# Altium PCB InterfaceBoard_PCB.PcbDoc (part 1 of 2)
Units mil, origin at the board's own origin, x right, y up, seen from the top; angles counter-clockwise.
Board outline 1629.92 x 1653.54 mil, 2 copper layers (Top Layer, Bottom Layer), stack 57 mil thick; 66 components, 48 nets, 226 pads, 80 vias.
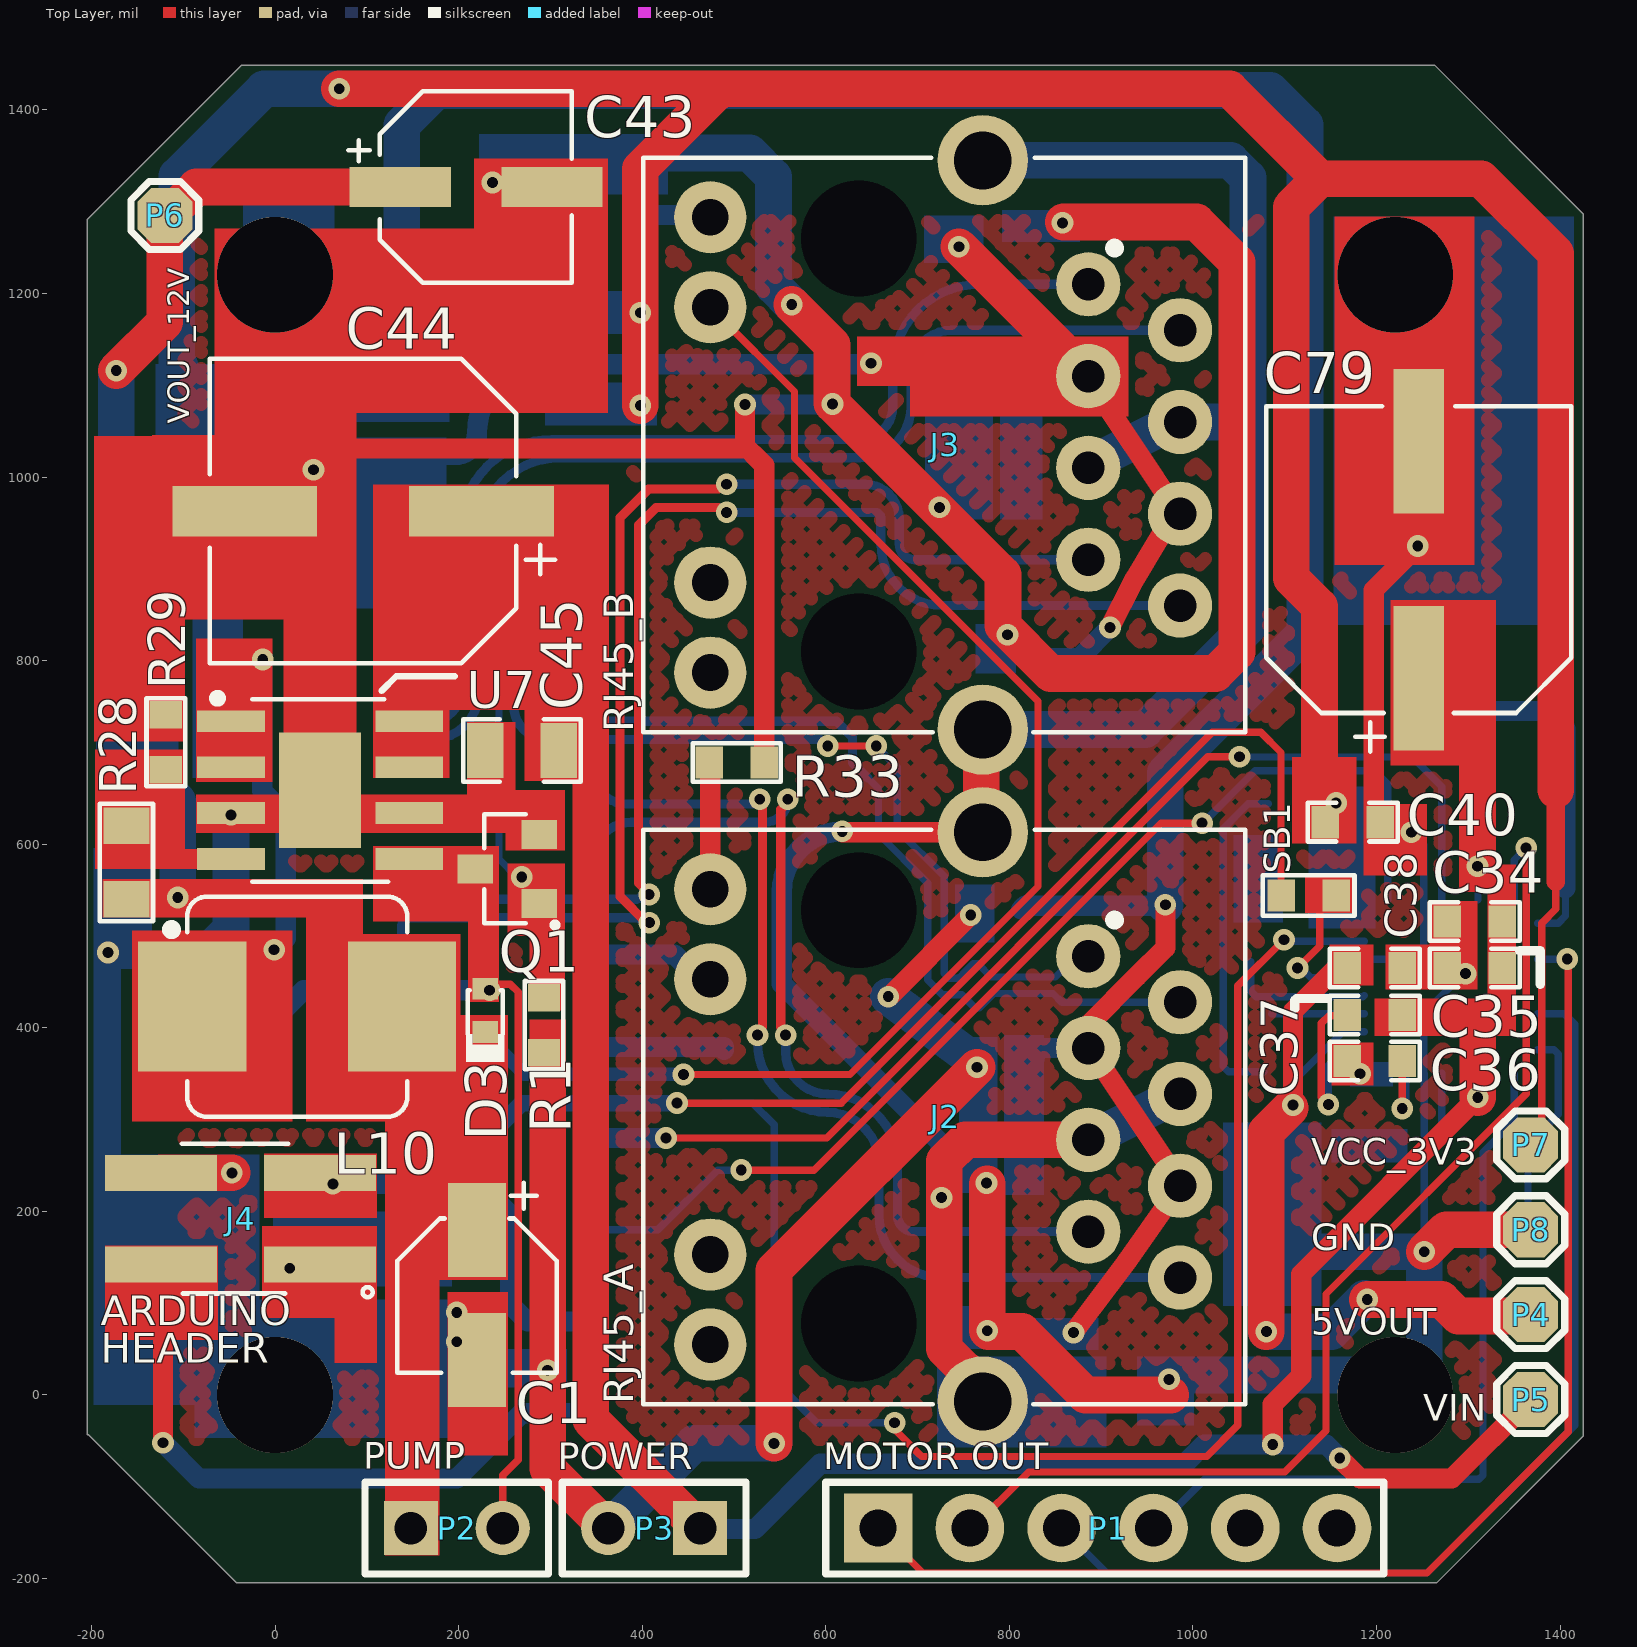
[diagram p0: Top Layer view]
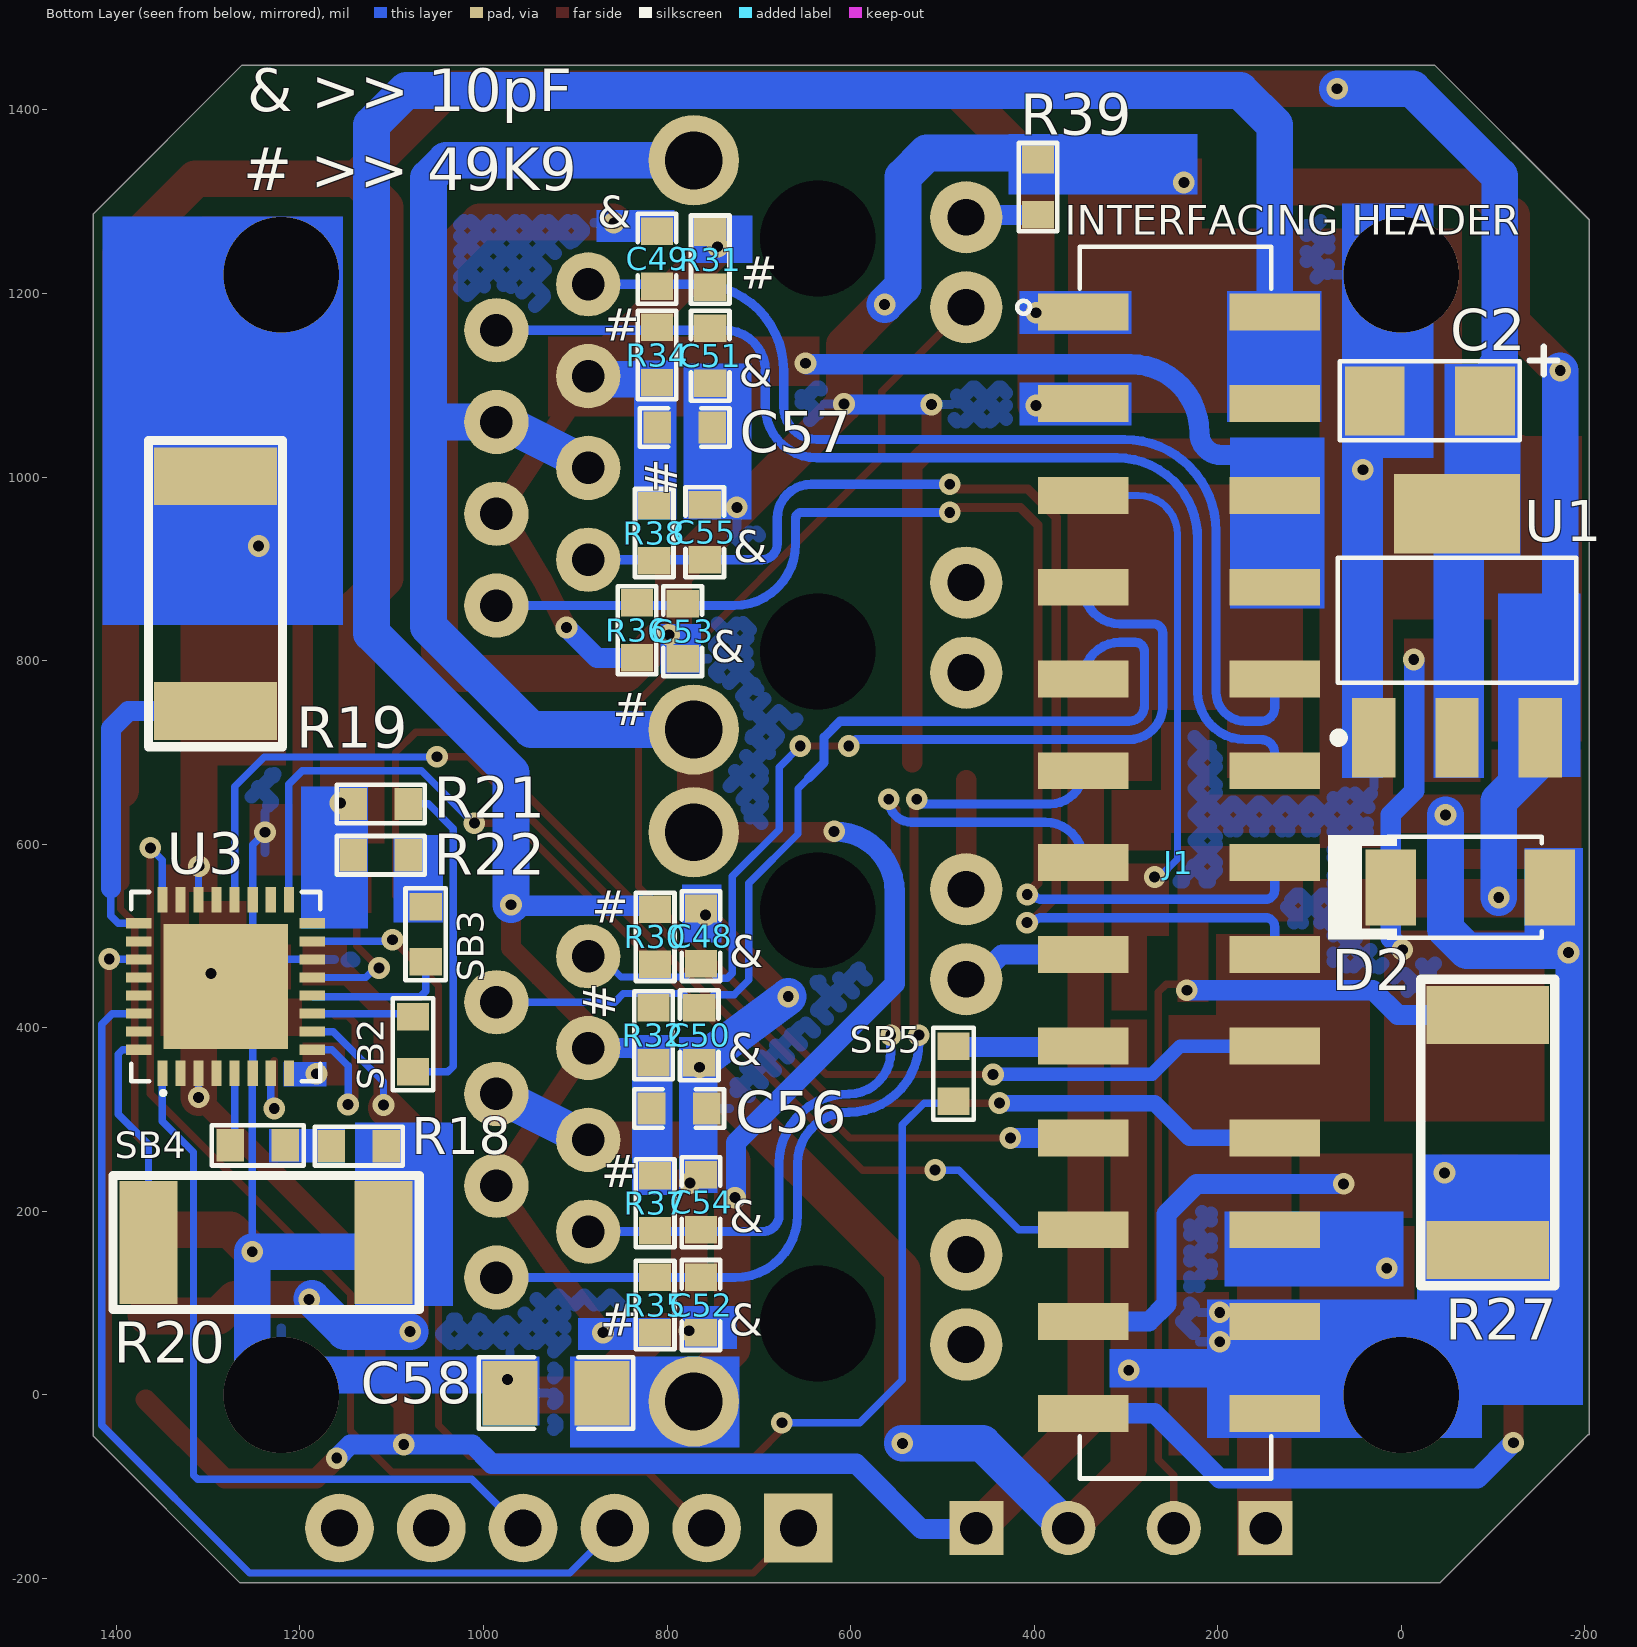
[diagram p1: Bottom Layer view, seen from below]
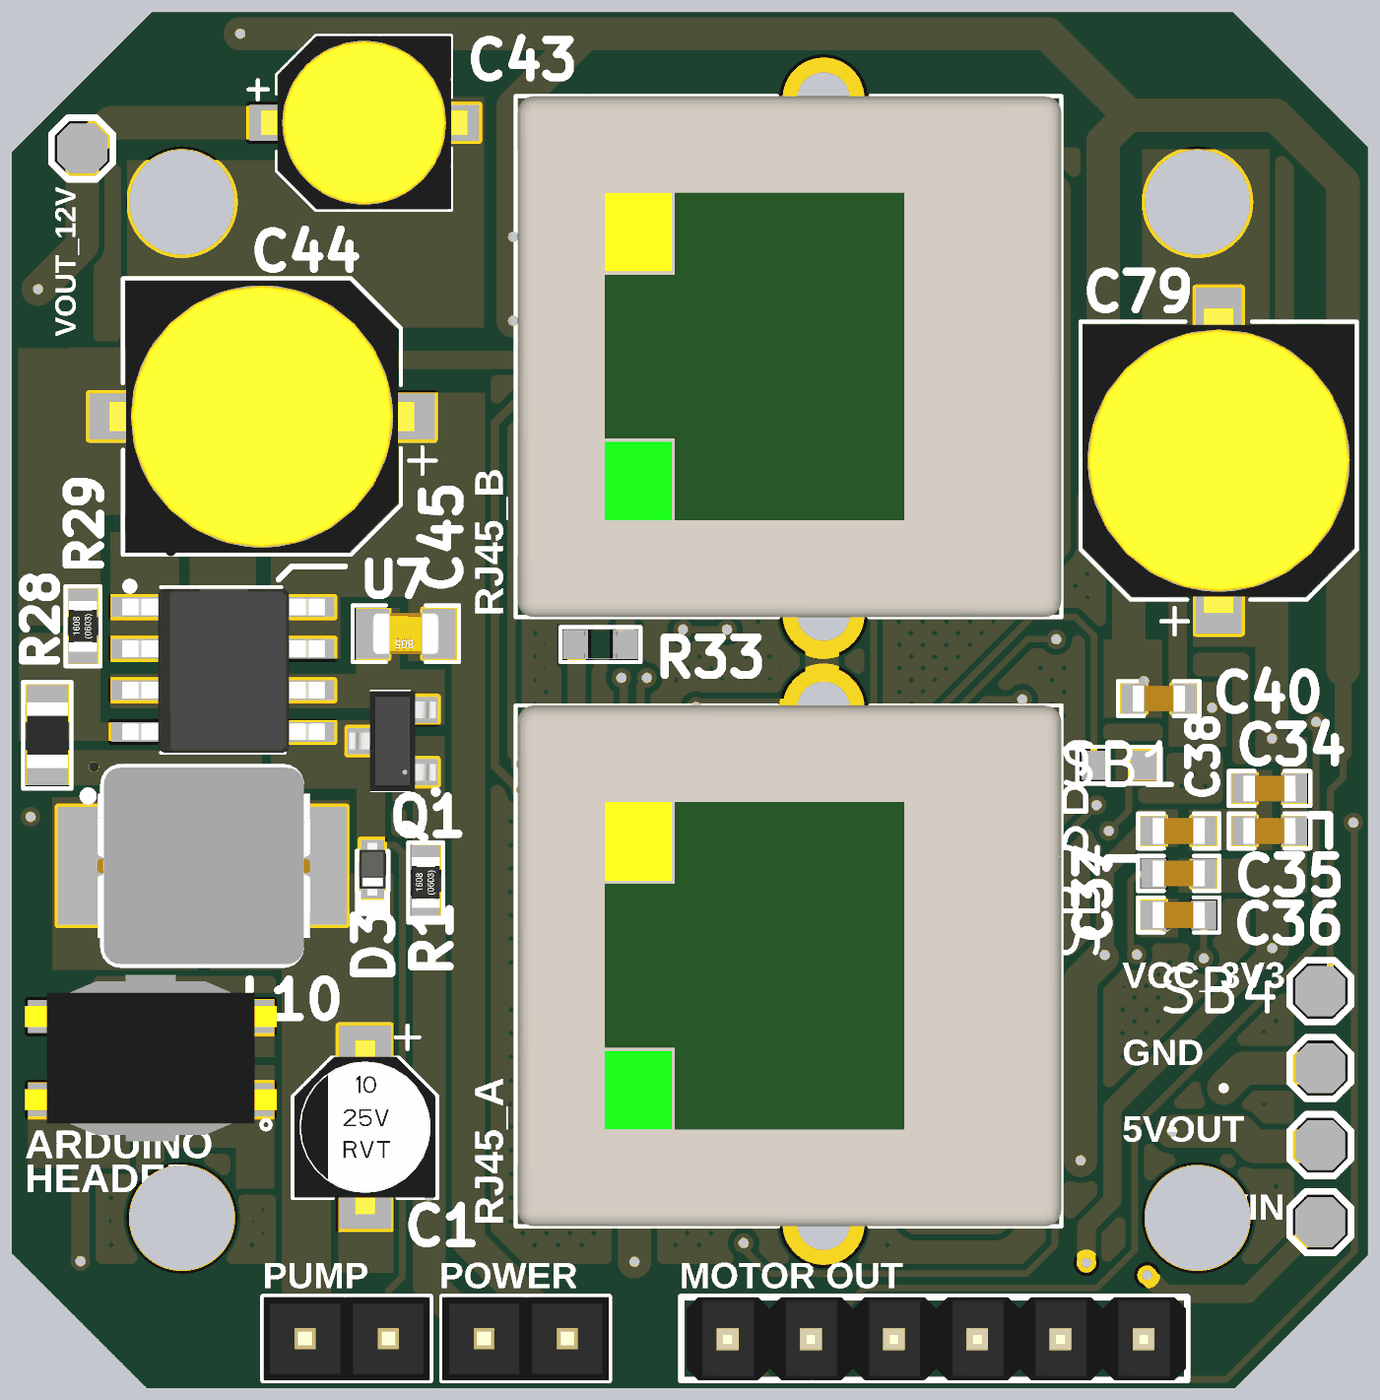
[diagram p2: 3D render of the assembled board from above, using the file's embedded part models]
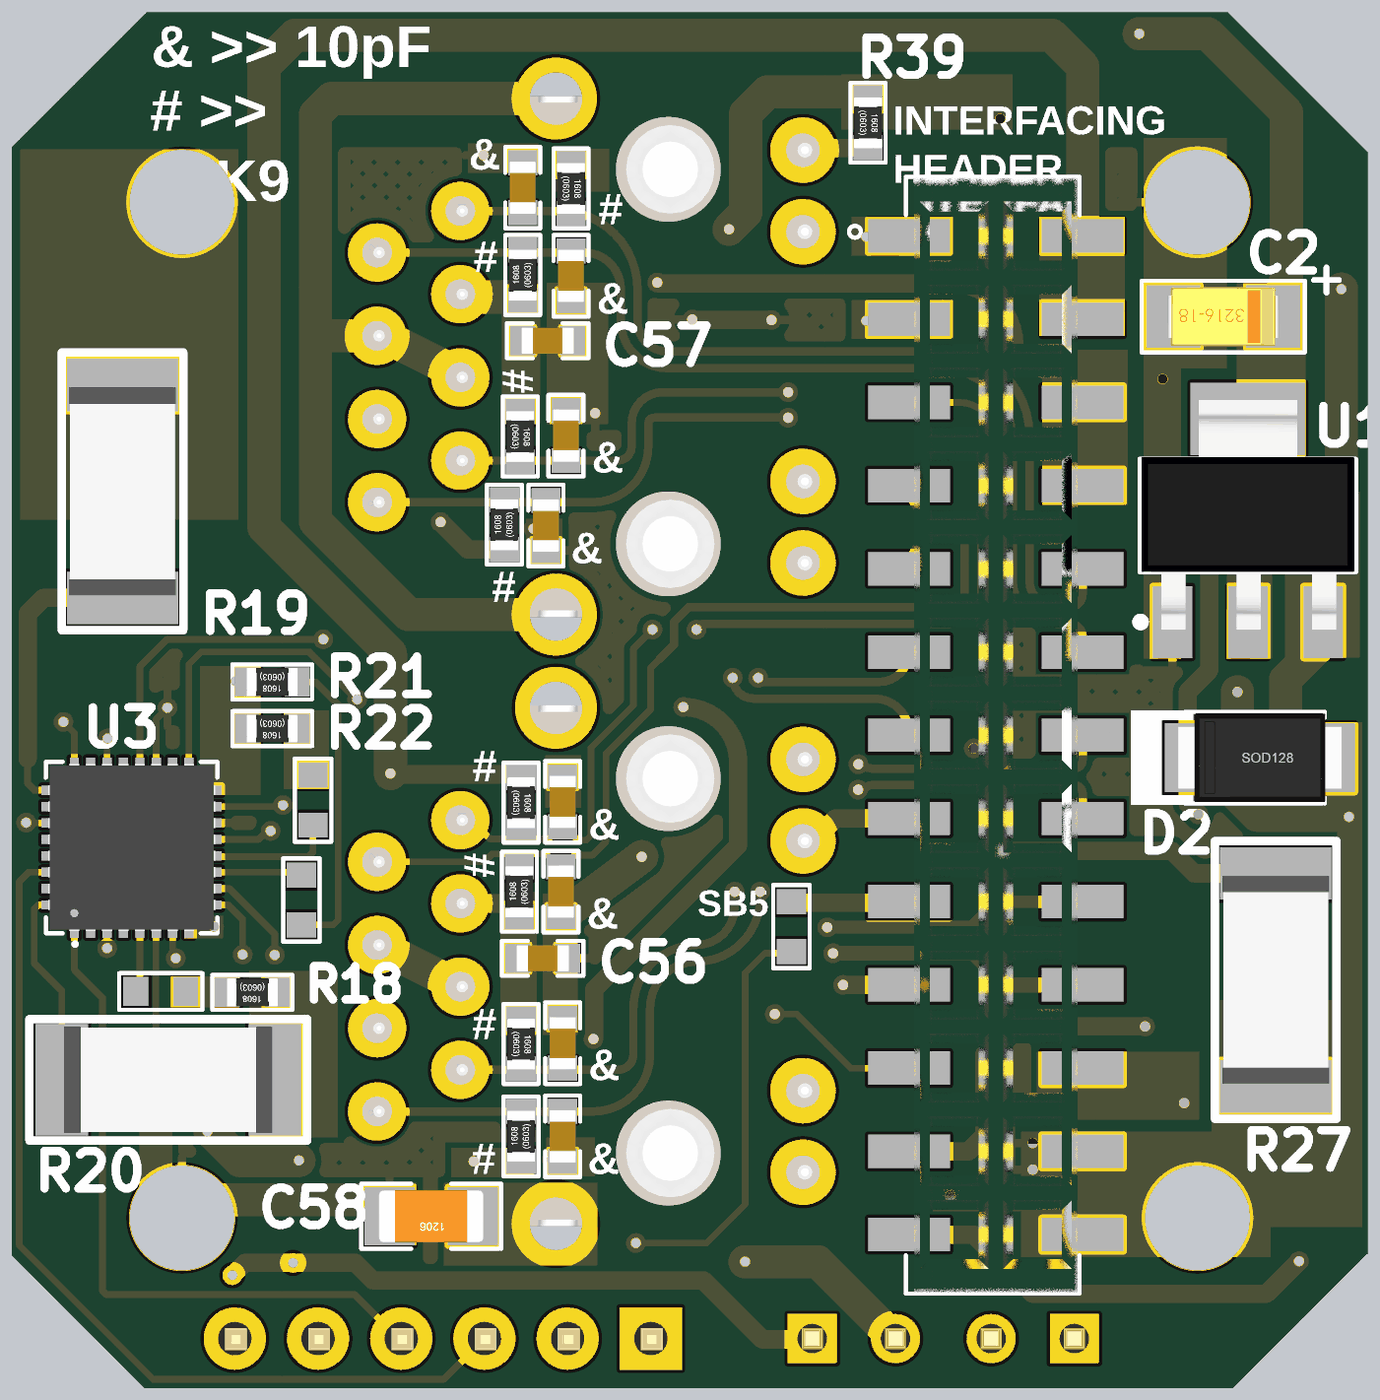
[diagram p3: 3D render of the assembled board from below, using the file's embedded part models]

## Layer stack, top to bottom
Top Solder: solder mask 3, Solder Resist, Dk 3.5
Top Layer: signal copper 10
Dielectric 1: dielectric 37, FR-4, Dk 4.8
Bottom Layer: signal copper 10
Bottom Solder: solder mask 3, Solder Resist, Dk 3.5

## Board outline
-204.72,-43.35 -203.18,-43.35 -41.8,-204.72 1265.28,-204.72 1425.2,-44.8 1425.2,1286.73 1263.11,1448.82 -36.18,1448.82 -204.72,1280.28

## Design rules (kind name [scope] priority, off if disabled: settings)
Clearance Clearance_2 [InDifferentialPairClass('EtherCAT_B_Lines')] p1: gap=7 ignorepadtopadclearanceinfootprint=FALSE except(0: Arc-Hole Track-Hole SMDPad-Hole THPad-Hole Via-Hole Fill-Hole Poly-Hole Region-Hole Text-Hole; 3: Arc-SMDPad Track-SMDPad SMDPad-SMDPad)
Clearance Clearance_1 [InDifferentialPairClass('EtherCAT_A_Lines')] p2: gap=7 ignorepadtopadclearanceinfootprint=FALSE except(0: Arc-Hole Track-Hole SMDPad-Hole THPad-Hole Via-Hole Fill-Hole Poly-Hole Region-Hole Text-Hole; 3: Arc-SMDPad Track-SMDPad SMDPad-SMDPad)
Clearance [All] p3: gap=7 ignorepadtopadclearanceinfootprint=FALSE except(0: Arc-Hole Track-Hole SMDPad-Hole THPad-Hole Via-Hole Fill-Hole Poly-Hole Region-Hole Text-Hole; 3: Arc-SMDPad Track-SMDPad SMDPad-SMDPad)
DiffPairsRouting DiffPairsRouting_1 [InDifferentialPairClass('EtherCAT_A_Lines')] p1: maxlimit=10 minlimit=10 mostfreqgap=10 toplayer_minwidth=8 toplayer_maxwidth=22 toplayer_prefwidth=10 bottomlayer_minwidth=8 bottomlayer_maxwidth=22 bottomlayer_prefwidth=10 maxuncoupledlength=500
DiffPairsRouting [InDifferentialPairClass('EtherCAT_B_Lines')] p2: maxlimit=10 minlimit=10 mostfreqgap=10 toplayer_minwidth=8 toplayer_maxwidth=22 toplayer_prefwidth=10 bottomlayer_minwidth=8 bottomlayer_maxwidth=22 bottomlayer_prefwidth=10 maxuncoupledlength=500
HoleSize [All] p1: absolutevalues=TRUE maxlimit=1000 minlimit=1 maxpercent=80.000 minpercent=20.000
HoleToHoleClearance [All] p1: gap=0 allowstackedmicrovias=TRUE
MatchedLengths "Schematic Matched Net Lengths_1" [InNetClass('EtherCAT_B')] p1: tolerance=1000 checknetsindiffpair=FALSE checkdiffpairvsdiffpair=TRUE checkxsignals=TRUE checkothers=TRUE
MatchedLengths "Schematic Matched Net Lengths" [InNetClass('EtherCAT_A')] p2: tolerance=1000 checknetsindiffpair=FALSE checkdiffpairvsdiffpair=TRUE checkxsignals=TRUE checkothers=TRUE
MaxMinImpedance "Schematic Impedance Constraint_1" [InNetClass('EtherCAT_A')] p1: minimum=90.00 maximum=110.0
MaxMinImpedance "Schematic Impedance Constraint" [InNetClass('EtherCAT_B')] p2: minimum=90.00 maximum=110.0
MinimumSolderMaskSliver [All] p1: minsoldermaskwidth=0
PolygonConnect [All] p1: connectstyle=Relief reliefconductorwidth=10 reliefentries=4 polygonreliefangle="90 Angle" airgapwidth=10
RoutingVias [All] p1: holewidth=11.81 width=23.62 viastyle="Through Hole" minholewidth=11.81 minwidth=23.62 maxholewidth=11.81 maxwidth=23.62
SilkToSilkClearance [All] p1: silktosilkclearance=0
SilkToSolderMaskClearance [IsPad] p1: minsilkscreentomaskgap=0 clearancetoexposedcopper=TRUE
SolderMaskExpansion [All] p1: expansion=4 istentingtop=FALSE
Width [All] p1: maxlimit=40 minlimit=8 preferedwidth=22
24 further rules are at their usual default settings.

## Classes and differential pairs
differential pair class EtherCAT_B_Lines: RXB TXB
differential pair class EtherCAT_A_Lines: RXA TXA
net class EtherCAT_B: RXB_N RXB_P TXB_N TXB_P
net class EtherCAT_A: RXA_N RXA_P TXA_N TXA_P
component class U_Stepper-Driver: C34 C35 C36 C37 C38 C40 C79 P4 P5 P6 P7 P8 R18 R19 R20 R21 R22 S SB1 SB2 SB3 SB4 SB5 U3
component class U_Pump-Power: C43 C44 C45 D2 l L10 R27 R28 R29 U7
component class U_MCU-Power: C1 C2 U1
component class U_Connector_Section: C48 C49 C50 C51 C52 C53 C54 C55 C56 C57 C58 D3 J1 J2 J3 J4 P1 P2 P3 Q1 R1 R30 R31 R32 R33 R34 R35 R36 R37 R38 R39
differential pair TXB: +TXB_P -TXB_N
differential pair TXA: +TXA_P -TXA_N
differential pair RXB: +RXB_P -RXB_N
differential pair RXA: +RXA_P -RXA_N

## Components (designator, comment, footprint, x,y, rotation, side; value= is the part's Value field where it differs from the comment)
C1 "10uF" RVT1E100M0405. 220,109 r270 top
C2 "22uF" "Cap Case-A" -31,1083 r180 bottom
C34 "0.1uF" Cap0603 1307,516 r180 top
C35 "0.1uF" Cap0603 1307,465 r180 top
C36 "22nF" Cap0603 1198,364 r180 top
C37 "0.1uF" Cap0603 1198,414 r0 top
C38 "2.2uF" Cap0603 1198,465 r0 top
C40 "0.1uF" Cap0603 1174,624 r0 top
C43 "100uF" VKMB1001E101MV 219,1316 r0 top locked
C44 "100uF" VKMD1001J101MV 96,963 r180 top locked
C45 "1uF" Cap0805 269,702 r180 top
C48 "10pF" Cap0603 763,500 r90 bottom
C49 "10pF" Cap0603 811,1238 r90 bottom
C50 "10pF" Cap0603 765,392 r270 bottom
C51 "10pF" Cap0603 753,1132 r270 bottom
C52 "10pF" Cap0603 763,98 r270 bottom
C53 "10pF" Cap0603 783,832 r270 bottom
C54 "10pF" Cap0603 763,210 r90 bottom
C55 "10pF" Cap0603 759,940 r90 bottom
C56 "22nF" Cap0603 787,312 r180 bottom
C57 "22nF" Cap0603 781,1054 r180 bottom
C58 "1000pF" Cap1206 921,2 r0 bottom
C79 "100uF" VKMD1001J101MV 1246,910 r90 top
D2 "PMEG3030EP,115" PMEG3030EP,115 -75,553 r0 bottom
D3 "MSK4010" MSK4010 229,419 r270 top value=Custom
J1 "PHF254SMD-x" PHF254SMD-x 242.33,580 r270 bottom locked
J2 "SK07-111071ENL*" "SK07- 111071ENL" 730.09,302.92 r270 top locked
J3 "SK07-111071ENL*" "SK07- 111071ENL" 730.09,1035 r270 top locked
J4 "1125N1202SNM" 1125N1202SNM -37.61,192 r90 top locked
L10 "33µH" ETQ-P4M330YFN 24.17,423 r0 top locked
P1 "C37208" C37208 907,-145 r0 top
P2 "826629-2" HDR1X2 148,-145 r0 top
P3 "826629-2" HDR1X2 463,-145 r180 top
P4 "Test Point" "TEST POINT" 1368,87.5 r180 top
P5 "Test Point" "TEST POINT" 1368,-5 r90 top
P6 "Test Point" "TEST POINT" -120,1285 r0 top
P7 "Test Point" "TEST POINT" 1368,272.5 r180 top
P8 "Test Point" "TEST POINT" 1368,180 r90 top
Q1 "IRLML2502TRPBF" IRLML2502TRPBF 253,573 r90 top
R1 "10K" Res0603 293,403 r270 top
R18 "10K" Res0603 1136,271 r180 bottom
R19 "180m" "RES 2512" 1292,872.95 r270 bottom
R20 "180m" "RES 2512" 1237,166 r0 bottom
R21 "1K" Res0603 1112,644 r180 bottom
R22 "1K" Res0603 1112,588 r180 bottom
R27 "75m" "RES 2512" -94,286.05 r90 bottom
R28 "9K" "RES 0805" -162,580 r90 top
R29 "1K" Res0603 -119,711 r270 top
R30 "49K9" Res0603 813,499 r90 bottom
R31 "49K9" Res0603 753,1237 r90 bottom
R32 "49K9" Res0603 815,392 r270 bottom
R33 "330R" Res0603 503,689 r0 top locked
R34 "49K9" Res0603 811,1133 r270 bottom
R35 "49K9" Res0603 813,98 r270 bottom
R36 "49K9" Res0603 833,833 r270 bottom
R37 "49K9" Res0603 813,209 r90 bottom
R38 "49K9" Res0603 814,939 r90 bottom
R39 "330R" Res0603 396,1316 r90 bottom
SB1 "Solder Bridge" "Solder Bridge" 1126,544 r180 top
SB2 "Solder Bridge" "Solder Bridge" 1077,382 r270 bottom
SB3 "Solder Bridge" "Solder Bridge" 1063,502 r90 bottom
SB4 "Solder Bridge" "Solder Bridge" 1246,272 r0 bottom
SB5 "Solder Bridge" "Solder Bridge" 488,350 r270 bottom
U1 "AZ1117CH-3.3TRG1" AZ1117CH-3.3TRG1 -60.55,838.05 r180 bottom value=Custom
U3 "TMC2202-WA-T" "32-QFN (5x5)" 1281,445 r90 bottom
U7 "XL4001E1" XL4001E1 49.05,659 r0 top locked value=Custom

## Footprints (in the part's own frame and the unit in brackets; to place one, negate y for a bottom-side part, rotate by r counter-clockwise, add the part's x,y. Pads: shape width x height; smd on the part's side, far side on the other; paste and mask are expansions set on the pad)
"32-QFN (5x5)" [mm]
  rect 0.7x0.28 smd: 1(-2.4,1.75) 2(-2.4,1.25) 3(-2.4,0.75) 4(-2.4,0.25) 5(-2.4,-0.25) 6(-2.4,-0.75) 7(-2.4,-1.25) 8(-2.4,-1.75) 17(2.4,-1.75) 18(2.4,-1.25) 19(2.4,-0.75) 20(2.4,-0.25) 21(2.4,0.25) 22(2.4,0.75) 23(2.4,1.25) 24(2.4,1.75)
  rect 0.28x0.7 smd: 9(-1.75,-2.4) 10(-1.25,-2.4) 11(-0.75,-2.4) 12(-0.25,-2.4) 13(0.25,-2.4) 14(0.75,-2.4) 15(1.25,-2.4) 16(1.75,-2.4) 25(1.75,2.4) 26(1.25,2.4) 27(0.75,2.4) 28(0.25,2.4) 29(-0.25,2.4) 30(-0.75,2.4) 31(-1.25,2.4) 32(-1.75,2.4)
  rect 3.45x3.45 smd: 33(0,0)
  silkscreen extent -3,-2.62 2.62,2.62, body extent -2.55,-2.55 2.55,2.55, height 0.84
1125N1202SNM [mm] "CONN HEADER 4 POS 2.54mm SMD"
  rect 1x3.1 smd: 1(-1.27,-2.2) 2(-1.27,2.2) 3(1.27,-2.2) 4(1.27,2.2)
  silkscreen extent -2.17,-3.66 2.07,1.62, body extent -2.54,-3.85 2.54,3.85, height 10.88
AZ1117CH-3.3TRG1 [mm] "15V 1.3V @ 800mA Fixed 3.3V SOT-223 Linear Voltage Regulators (LDO) ROHS"
  rect 1.2x2.2 smd: 1(-2.3,-3.1) 2(0,-3.1) 3(2.3,-3.1)
  rect 3.5x2.2 smd: 4(0,3.1)
  silkscreen extent -3.4,-3.23 3.3,1.88, body extent -3.25,-3.32 3.25,3.68, height 1.68
C37208 [mm]
  rect 1.9x1.9 hole 1.02: 1(-6.35,0)
  round 1.9 hole 1.02: 2(-3.81,0) 3(-1.27,0) 4(1.27,0) 5(3.81,0) 6(6.35,0)
  silkscreen extent -7.8,-1.27 7.65,1.27, body extent -7.63,-1.27 7.61,1.27, height 9.2
Cap0603 [mil]
  rect 30x35 smd mask+2.36: 1(-30,0) 2(30,0)
  silkscreen extent -49,-21 49,21, body extent -32,-16 31,16, height 34
Cap0805 [mil] "SMD 0805"
  rect 40x60 smd mask+2.76: 1(-40,0) 2(40,0)
  silkscreen extent -64,-34 64,34, body extent -39,-25 39,25, height 30
Cap1206 [mil] "SMD 1206"
  rect 60x70 smd: 1(-50,0) 2(50,0)
  silkscreen extent -84,-39 84,39, body extent -63,-31 63,32, height 39
"Cap Case-A" [mil] "Case-A"
  rect 65x75 smd: 1(-60,0) 2(60,0)
  silkscreen extent -98,-43 139,59, body extent -67,-35 67,35, height 71
ETQ-P4M330YFN [mm] "FIXED IND 33UH 2.5A 189.2MOHM SM"
  rect 3x3.6 smd: 1(-2.9,0) 2(2.9,0)
  silkscreen extent -3.62,-3.05 3.05,3.05, body extent -3.2,-3 3.3,3, height 4.39
HDR1X2 [mm] "CONN HEADER VERT 2POS 2.54MM"
  rect 1.5x1.5 hole 0.9: 1(0,0)
  round 1.5 hole 0.9: 2(2.54,0)
  silkscreen extent -1.27,-1.27 3.81,1.27, body extent -1.27,-1.27 3.81,1.27, height 8.44
IRLML2502TRPBF [mm] "MOSFET N-CH 20V 4.2A SOT23"
  rect 0.802x0.972 smd: 1(-0.95,-0.885) 2(0.95,-0.885) 3(0,0.885)
  silkscreen extent -1.57,-1.35 1.51,0.64, body extent -1.52,-1.32 1.52,1.32, height 1.12
MSK4010 [mm] "SOD-523 Schottky Barrier Diodes (SBD) ROHS"
  rect 0.6x0.7 smd: 1(-0.6,0) 2(0.6,0)
  silkscreen extent -0.56,-0.53 1.42,0.53, body extent -0.8,-0.4 0.8,0.4, height 0.7
PHF254SMD-x [mm]
  rect 1.02x2.5 smd: 1(-15.24,-2.65) 2(-15.24,2.65) 3(-12.7,-2.65) 4(-12.7,2.65) 5(-10.16,-2.65) 6(-10.16,2.65) 7(-7.62,-2.65) 8(-7.62,2.65) 9(-5.08,-2.65) 10(-5.08,2.65) 11(-2.54,-2.65) 12(-2.54,2.65) 13(0,-2.65) 14(0,2.65) 15(2.54,-2.65) 16(2.54,2.65) 17(5.08,-2.65) 18(5.08,2.65) 19(7.62,-2.65) 20(7.62,2.65) 21(10.16,-2.65) 22(10.16,2.65) 23(12.7,-2.65) 24(12.7,2.65) 25(15.24,-2.65) 26(15.24,2.65)
  silkscreen extent -17.04,-4.48 17.04,2.55, body extent -17.01,-3.5 17.01,3.5, height 8.5
PMEG3030EP,115 [mm] "DIODE SCHOTTKY 30V 3A CFP5"
  rect 1.4x2.1 smd: 1(-2.2,0) 2(2.2,0)
  silkscreen extent -1.98,-1.45 3.94,1.45, body extent -2.5,-1.35 2.5,1.35, height 1.1
Res0603 [mil]
  rect 30x35 smd: 1(-30,0) 2(30,0)
  silkscreen extent -48,-21 48,21, body extent -31,-17 31,17, height 18
"RES 0805" [mil] "SMD 0805"
  rect 40x50 smd: 1(-40,0) 2(40,0)
  silkscreen extent -64,-29 64,29, body extent -39,-25 39,24, height 24
"RES 2512" [mm] "0.033O ±1% 2W ±1800ppm/°C 2512 Low Resistors & Current Sense Resistors - Surface Mount RoHS"
  rect 1.6x3.4 smd: 1(-3.25,0) 2(3.25,0)
  silkscreen extent -4.24,-1.85 4.24,1.85, body extent -3.17,-1.63 3.18,1.63, height 0.58
RVT1E100M0405. [mm] "10uF 25V 5.4mm SMD"
  rect 2.6x1.6 smd: 1(-1.8,0) 2(1.8,0)
  silkscreen extent -3.1,-2.21 2.16,2.21, body extent -2.65,-2.15 2.65,2.15, height 3.95
"SK07- 111071ENL" [mm] "CONN RJ45 WITH LED AND MAGNETICS"
  round 1.78 hole 0.9: 1(-4.445,3.96) 2(-3.175,6.5) 3(-1.905,3.96) 4(-0.635,6.5) 5(0.635,3.96) 6(1.905,6.5) 7(3.175,3.96) 8(4.445,6.5)
  round 2 hole 1.02: L1(6.3,-6.5) L2(3.81,-6.5) L3(-3.81,-6.5) L4(-6.3,-6.5)
  round 2.5 hole 1.6: MH1(7.875,1.04) MH2(-7.875,1.04)
  round 0 hole 3.2 unplated: MH3(-5.715,-2.39) MH4(5.715,-2.39)
  silkscreen extent -7.95,-8.36 7.95,8.3, body extent -7.95,-8.3 7.95,8.3, height 16.7
"Solder Bridge" [mil] "Solder Bridge ON"
  rect 30x35 smd: 1(-30,0) 2(30,0)
  silkscreen extent -50,-22 50,22
"TEST POINT" [mil]
  oct 60x60 smd: 1(0,0)
  silkscreen extent -37,-37 37,37
VKMB1001E101MV [mm] "25V 5mm 10mm 100uF"
  rect 2.8x1.1 smd: 1(-2.1,0) 2(2.1,0)
  silkscreen extent -3.53,-2.65 2.65,2.65, body extent -3.15,-2.65 3.15,2.65, height 9.95
VKMD1001J101MV [mm] "63V 10mm 8mm 100uF ±20%"
  rect 4x1.4 smd: 1(-3.275,0) 2(3.275,0)
  silkscreen extent -5.31,-4.22 4.24,4.22, body extent -4.65,-4.15 4.65,4.15, height 9.95
XL4001E1 [mm]
  rect 1.87x0.6 smd: 1(-2.465,1.905) 2(-2.465,0.635) 3(-2.465,-0.635) 4(-2.465,-1.905) 5(2.465,-1.905) 6(2.465,-0.635) 7(2.465,0.635) 8(2.465,1.905)
  rect 2.26x3.2 smd: 9(0,0)
  silkscreen extent -2.94,-2.54 1.88,2.64, body extent -3.07,-2.54 3.13,2.46, height 1.74

## Part data
C1: library part RVT1E100M0405, "CAP ALUM 10uF 25V SMD", Manufacturer=ROQANG, Operating Temperature=-45℃~+105℃, Rated Voltage=25V, Tolerance=±20%, Capacitance=10uF, L=5.4mm, φD=4mm
C2: library part CA45A-A-10V-22uF-K, "10V 22uF -55℃~+125℃ 6Ω 100kHz ±10% CASE-A_3216 Tantalum Capacitors ROHS", Manufacturer="CEC(Shenzhen Zhenhua XinYun Elec)", Package=CASE-A_3216, ComponentLink1Description=LCSC, ComponentLink1URL=https://lcsc.com/product-detail/Tantalum-Capacitors_CEC-Shenzhen-Zhenhua-XinYun-Elec-CA45A-A-10V-22uF-K_C141745.html, Manufacturer Part No=CA45A-A-10V-22uF-K
C34 C35 C37 C40: library part CC0603KRX7R0BB104, "CAP CER 0.1UF 100V X7R 0603", Capacitance=100nF, Case Code (Imperial)=0603, Case Code (Metric)=1608, Dielectric=X7R, Manufacturer=Yageo, Max Operating Temperature=125°C, Min Operating Temperature=-55°C, Package Quantity=4000, Resistor Type=Ceramic, Supplier Part Number 1=311-1523-1-ND, Tolerance=10%, Voltage Rating=100V, Case/Package=0603, Category="Ceramic Capacitors", ComponentLink1Description=https://datasheet.ciiva.com/6277/mlccorderingcode-6277030.pdf?src-supplier=Digi-Key, ComponentLink1URL=https://datasheet.ciiva.com/6277/mlccorderingcode-6277030.pdf?src-supplier=Digi-Key, ComponentLink2Description=https://datasheet.ciiva.com/6277/mlccorderingcode-6277081.pdf?src-supplier=Digi-Key, ComponentLink2URL=https://datasheet.ciiva.com/6277/mlccorderingcode-6277081.pdf?src-supplier=Digi-Key, ComponentLink3Description=https://datasheet.ciiva.com/6277/mlccorderingcode-6277082.pdf?src-supplier=Digi-Key, ComponentLink3URL=https://datasheet.ciiva.com/6277/mlccorderingcode-6277082.pdf?src-supplier=Digi-Key, Depth=0.8mm, Lead Free="Lead Free", Length=0.063inch, Manufacturer Part Number=CC0603KRX7R0BB104, Mount="Surface Mount", Packaging="Tape and Reel", Pricing 1="1=0.19000, 10=0.13500, 50=0.07680, 100=0.06370, 500=0.04466, 1000=0.03696 (USD)", RoHS=Yes, RoHS Compliant=Yes, Series=CC, Stock 1=60476, Supplier 1=Digi-Key, Termination=SMD/SMT, Thickness=0.035inch, Voltage Rating (DC)=100V, Weight=7.1E-05oz, Width=0.031inch
C36 C56 C57: library part CGA3E2X7R2A223K080AA, "CAP CER 0.022UF 100V X7R 0603", Case Code (Imperial)=0603, Case Code (Metric)=1608, Dielectric=X7R, Manufacturer=TDK, Max Operating Temperature=125°C, Min Operating Temperature=-55°C, Package Quantity=1, Ratings=AEC-Q200, Resistor Type=Ceramic, Supplier Part Number 1=445-5814-1-ND, Tolerance=10%, Voltage Rating=100V, Capacitance=22nF, Case/Package=0603, Category="Ceramic Capacitors", ComponentLink1Description=https://datasheet.ciiva.com/22725/1735406-22725648.pdf?src-supplier=Element14, ComponentLink1URL=https://datasheet.ciiva.com/22725/1735406-22725648.pdf?src-supplier=Element14, ComponentLink2Description=https://datasheet.ciiva.com/24218/cga3e2x7r2a223k080aa-266292-24218959.pdf?src-supplier=Mouser, ComponentLink2URL=https://datasheet.ciiva.com/24218/cga3e2x7r2a223k080aa-266292-24218959.pdf?src-supplier=Mouser, ComponentLink3Description=https://datasheet.ciiva.com/7975/1807242-7975349.pdf?src-supplier=Element14, ComponentLink3URL=https://datasheet.ciiva.com/7975/1807242-7975349.pdf?src-supplier=Element14, Depth=0.8mm, Height=0.8mm, Length=1.6mm, Manufacturer Part Number=CGA3E2X7R2A223K080AA, Mount="Surface Mount", Packaging="Tape and Reel", Pricing 1="1=0.11000, 10=0.07600, 50=0.04340, 100=0.03590, 500=0.02516, 1000=0.02083 (USD)", REACH SVHC="No SVHC", RoHS=Yes, RoHS Compliant=Yes, Series=CGA, Stock 1=56079, Supplier 1=Digi-Key, Termination=SMD/SMT, Thickness=0.035inch, Voltage Rating (DC)=100V, Weight=7.1E-05oz, Width=0.031inch
C38: library part UMK107BBJ225MA-T, "CAP CER 2.2UF 50V X5R 0603", Manufacturer="Taiyo Yuden", Supplier Part Number 1=587-6298-1-ND, Category="Ceramic Capacitors", Manufacturer Part Number=UMK107BBJ225MA-T, Pricing 1="1=0.26000, 10=0.18100, 50=0.12060, 100=0.10240, 500=0.07232, 1000=0.06327 (USD)", RoHS=Yes, RoHS Compliant=Yes, Stock 1=1, Supplier 1=Digi-Key
C43: library part VKMB1001E101MV, "25V 5mm 10mm 100uF 100kHz SMD,5x10mm Aluminum Electrolytic Cap- SMD ROHS", Manufacturer=Ymin, Voltage=25V, ComponentLink1Description=LCSC, ComponentLink1URL=https://lcsc.com/product-detail/Aluminum-Electrolytic-Capacitors-SMD_Ymin-VKMB1001E101MV_C487322.html, Manufacturer Part No=VKMB1001E101MV
C44 C79: library part VKMD1001J101MV, "63V 10mm 8mm 100uF ±20% ,8x10mm Aluminum Electrolytic Cap", Manufacturer=Ymin, Voltage=63V, ComponentLink1Description=LCSC, ComponentLink1URL=https://lcsc.com/product-detail/Aluminum-Electrolytic-Capacitors-SMD_Ymin-VKMD1001J101MV_C487384.html, Manufacturer Part No=VKMD1001J101MV
C45: library part GCM21BC72A105KE36L, "CAP CER 1UF 100V X7S 0805", Case Code (Imperial)=0805, Case Code (Metric)=2012, Manufacturer=Murata, Max Operating Temperature=125°C, Min Operating Temperature=-55°C, Ratings=AEC-Q200, Supplier Part Number 1=490-14436-1-ND, Tolerance=10%, Voltage Rating=100V, Capacitance=1uF, Case/Package=0805, Category="Ceramic Capacitors", ComponentLink1Description=http://search.murata.co.jp/Ceramy/image/img/A01X/partnumbering_e_02.pdf?src-supplier=Digi-Key, ComponentLink1URL=http://search.murata.co.jp/Ceramy/image/img/A01X/partnumbering_e_02.pdf?src-supplier=Digi-Key, Manufacturer Part Number=GCM21BC72A105KE36L, Mount="Surface Mount", Packaging="Cut Tape", Pricing 1="1=0.48000, 10=0.34100, 50=0.25800, 100=0.22480, 500=0.16650, 1000=0.14152 (USD)", RoHS=Yes, RoHS Compliant=Yes, Stock 1=179138, Supplier 1=Digi-Key
C48 C49 C50 C51 C52 C53 C54 C55: library part 06035A100JAT2A, "CAP CER 10PF 50V C0G/NP0 0603", Case/Package=0603, Dielectric=C0G, Insulation Resistance=100GR, Manufacturer="Kyocera AVX", Manufacturer Part Number=06035A100JAT2A/4K, Max Operating Temperature=125°C, Min Operating Temperature=-55°C, Supplier Part Number 1=478-1163-1-ND, Temperature Coefficient=30ppm/°C, Tolerance=5%, Voltage=50V, Capacitance=10pF, Depth=0.81mm, Height=0.9mm, Lead Free="Lead Free", Length=1.6mm, Mount="Surface Mount", Number of Pins=2, Packaging="Cut Tape", Pricing 1="1=0.1, 10=0.05, 50=0.0272, 100=0.0222, 500=0.01586, 1000=0.01246 (USD)", REACH SVHC="No SVHC", Stock 1=196463, Supplier 1=Digi-Key, Thickness=864um, Voltage Rating (DC)=50V, Width=810um
C58: library part CC1206KKX7RDBB102, "1206 1 nF 2 kV ±10 % Tolerance X7R SMT Multilayer Ceramic Capacitor", Capacitance=1nF, Case Code (Imperial)=1206, Case Code (Metric)=3216, Dielectric=X7R, Insulation Resistance=10GR, Manufacturer=Yageo, Max Operating Temperature=125°C, Min Operating Temperature=-55°C, Package Quantity=1, Resistor Type=Ceramic, Supplier Part Number 1=311-1487-1-ND, Tolerance=10%, Voltage=2kV, Case/Package=1206, Category="Ceramic Capacitors", ComponentLink1Description=https://datasheet.ciiva.com/23942/1449957-23942422.pdf?src-supplier=Newark, ComponentLink1URL=https://datasheet.ciiva.com/23942/1449957-23942422.pdf?src-supplier=Newark, ComponentLink2Description=https://datasheet.ciiva.com/186/upy-np0x7r-hv-1kv-to-3kv-4-186736.pdf?src-supplier=Digi-Key, ComponentLink2URL=https://datasheet.ciiva.com/186/upy-np0x7r-hv-1kv-to-3kv-4-186736.pdf?src-supplier=Digi-Key, ComponentLink3Description=https://datasheet.ciiva.com/186/upy-np0x7r-hv-1kv-to-3kv-4-186737.pdf?src-supplier=Digi-Key, ComponentLink3URL=https://datasheet.ciiva.com/186/upy-np0x7r-hv-1kv-to-3kv-4-186737.pdf?src-supplier=Digi-Key, ComponentLink4Description=https://datasheet.ciiva.com/13386/upy-gp-np0-16v-to-50v-8-13386312.pdf?src-supplier=Mouser, ComponentLink4URL=https://datasheet.ciiva.com/13386/upy-gp-np0-16v-to-50v-8-13386312.pdf?src-supplier=Mouser, ComponentLink5Description=https://datasheet.ciiva.com/186/upy-np0x7r-hv-1kv-to-3kv-4-186735.pdf?src-supplier=Digi-Key, ComponentLink5URL=https://datasheet.ciiva.com/186/upy-np0x7r-hv-1kv-to-3kv-4-186735.pdf?src-supplier=Digi-Key, Construction=Flat, Depth=1.6mm, Dissipation Factor=2.5%, Height=1.25mm, Lead Free="Lead Free", Length=3.2mm, Manufacturer Part Number=CC1206KKX7RDBB102, Mount="Surface Mount", Number of Pins=2, Packaging="Tape and Reel", Pricing 1="1=0.35000, 10=0.24000, 50=0.16780, 100=0.14390, 500=0.10794, 1000=0.09114 (USD)", Radiation Hardening=No, REACH SVHC=Unknown, RoHS=Yes, RoHS Compliant=Yes, Series=CC, Stock 1=19260, Supplier 1=Digi-Key, Termination=SMD/SMT, Thickness=0.057inch, Voltage Rating=2kV, Voltage Rating (DC)=2kV, Width=0.063inch
D2: "Diode Schottky 30V 3A 2-Pin SOD-128 T/R", Average Rectified Current=3A, Forward Voltage=360mV, Manufacturer="NXP Semiconductors", Manufacturer Part Number=PMEG3030EP-115, Max Operating Temperature=150°C, Max Repetitive Reverse Voltage (Vrrm)=30V, Max Reverse Current=1.5mA, Max Surge Current=50A, Min Operating Temperature=-55°C, Package Quantity=1, Power Dissipation=625mW, Supplier Part Number 1=85W3397, Category="Rectifier Diodes", ComponentLink1Description=https://datasheet.ciiva.com/4453/pmeg3030ep-103074-4453360.pdf?src-supplier=Mouser, ComponentLink1URL=https://datasheet.ciiva.com/4453/pmeg3030ep-103074-4453360.pdf?src-supplier=Mouser, ComponentLink2Description=https://datasheet.ciiva.com/8299/pmeg3030ep-8299156.pdf?src-supplier=Avnet, ComponentLink2URL=https://datasheet.ciiva.com/8299/pmeg3030ep-8299156.pdf?src-supplier=Avnet, ComponentLink3Description=https://datasheet.ciiva.com/917/pmeg3030ep-917049.pdf?src-supplier=Digi-Key, ComponentLink3URL=https://datasheet.ciiva.com/917/pmeg3030ep-917049.pdf?src-supplier=Digi-Key, ComponentLink4Description=https://datasheet.ciiva.com/917/pmeg3030ep-917048.pdf?src-supplier=Digi-Key, ComponentLink4URL=https://datasheet.ciiva.com/917/pmeg3030ep-917048.pdf?src-supplier=Digi-Key, ComponentLink5Description=https://datasheet.ciiva.com/917/pmeg3030ep-917050.pdf?src-supplier=Digi-Key, ComponentLink5URL=https://datasheet.ciiva.com/917/pmeg3030ep-917050.pdf?src-supplier=Digi-Key, ComponentLink6Description=https://datasheet.ciiva.com/8299/pmeg3030ep-8299301.pdf?src-supplier=Avnet, ComponentLink6URL=https://datasheet.ciiva.com/8299/pmeg3030ep-8299301.pdf?src-supplier=Avnet, Element Configuration=Single, Forward Current=3A, Lead Free="Lead Free", Max Reverse Voltage (DC)=30V, Mount="Surface Mount", Number of Pins=2, Packaging="Tape and Reel", Peak Non-Repetitive Surge Current=50A, Radiation Hardening=No, Reverse Voltage=30V, RoHS=Yes, Series=-, Supplier 1=Newark
D3: "SOD-523 Schottky Barrier Diodes (SBD) ROHS", Manufacturer="Tak Cheong", ComponentLink1Description=LCSC, ComponentLink1URL=https://lcsc.com/product-detail/Schottky-Barrier-Diodes-SBD_Tak-Cheong-MSK4010_C968723.html, Manufacturer Part No=MSK4010, Pakage=SOD-523
J1: "P=2.54mm Female Headers,SMD,ROHS", Manufacturer=RTLECS, Package=Custom, Manufacturer Part No=PHF254SMD-x
J2 J3: library part SK07-111071ENL, "10/100 BASE-TX RJ45 WITH LEDS / INTEGRATED MAGNETICS CONNECTOR", Manufacturer="SAK ELECTRONICS CO.,LTD", OPERATION TEMPERATURE RANGE="0°C TO +70°C", SHIELD=BRASS, Thickness=0.2mm
J4: "CONN HEADER 4 POS 2.54mm SMD", Current Rating="3 A", Manufacturer=RTLECS, Connector Type="Pin header Male SMT", Pitch=2.54
L10: library part ETQ-P4M330YFN, "FIXED IND 33UH 2.5A 189.2MOHM SM", Case/Package=SMD/SMT, Current Rating=2.5A, DC Resistance (DCR)=189.2mR, Inductance=33uH, Manufacturer=Panasonic, Max Operating Temperature=150°C, Min Operating Temperature=-40°C, Ratings=AEC-Q200, Saturation Current=4.1A, Supplier Part Number 1=P122549CT-ND, Test Frequency=100kHz, Tolerance=20%, Category="Fixed Inductors", ComponentLink1Description=https://industrial.panasonic.com/cdbs/www-data/pdf/AGL0000/AGL0000C59.pdf?src-supplier=Digi-Key, ComponentLink1URL=https://industrial.panasonic.com/cdbs/www-data/pdf/AGL0000/AGL0000C59.pdf?src-supplier=Digi-Key, Core Material=Metal,Composite, Manufacturer Part Number=ETQ-P4M330YFN, Mount="Surface Mount", Packaging="Tape and Reel", Pricing 1="1=1.56000, 10=1.44400, 25=1.33320, 50=1.11100, 100=1.04430, 250=0.93324 (USD)", RoHS=No, Shielding=Shielded, Stock 1=482, Supplier 1=Digi-Key
P1: "Straight 1 6 2.54mm Black Brass Plugin,P=2.54mm Pin Headers ROHS", Manufacturer=BOOMELEC, Package=Custom, ComponentLink1Description="New link", ComponentLink1URL=https://www.lcsc.com/product-detail/Pin-Headers_BOOMELE-Boom-Precision-Elec-C37208_C37208.html, Manufacturer Part No=C37208
P2 P3: "CONN HEADER VERT 2POS 2.54MM", Color=Green, Current Rating=3A, Flammability Rating="UL94 V-0", High Temperature Housing=No, Manufacturer="TE Connectivity", Manufacturer Part Number=8266292, Max Operating Temperature=105°C, Min Operating Temperature=-65°C, Package Quantity=3000, Supplier Part Number 1=1361864, Board Standoff="No (Without)", Category="Board to Board Connectors", ComponentLink1Description=https://datasheet.ciiva.com/11746/0900766b80d7c358-11746248.pdf?src-supplier=RSComponents, ComponentLink1URL=https://datasheet.ciiva.com/11746/0900766b80d7c358-11746248.pdf?src-supplier=RSComponents, ComponentLink2Description=https://datasheet.ciiva.com/30224/8266292-30224019.pdf?src-supplier=Onlinecomponents.com, ComponentLink2URL=https://datasheet.ciiva.com/30224/8266292-30224019.pdf?src-supplier=Onlinecomponents.com, ComponentLink3Description=https://datasheet.ciiva.com/29369/001094754-da-01-en-stiftleiste-1-reihig-0-0826629-2-29369600.pdf?src-supplier=Conrad, ComponentLink3URL=https://datasheet.ciiva.com/29369/001094754-da-01-en-stiftleiste-1-reihig-0-0826629-2-29369600.pdf?src-supplier=Conrad, ComponentLink4Description=https://datasheet.ciiva.com/6857/eng-cd-826629-aa-basefilename-6857135.pdf?src-supplier=Digi-Key, ComponentLink4URL=https://datasheet.ciiva.com/6857/eng-cd-826629-aa-basefilename-6857135.pdf?src-supplier=Digi-Key, ComponentLink5Description=https://datasheet.ciiva.com/14120/eh826629-draw-14120837.pdf?src-supplier=Distrelec, ComponentLink5URL=https://datasheet.ciiva.com/14120/eh826629-draw-14120837.pdf?src-supplier=Distrelec, Connector Type=Plug,Header,Pin, Contact Gender=Male, Contact Material=Bronze, Contact Mating Length=6.7mm, Contact Plating=Gold,Tin, Contact Post Length=0.1259inch, Contact Protection="No (Without)", Contact Shape=Square, Contact Type="Male Pin", Depth=2.5mm, ELV=Compliant, Gasket="No (Without)", Gender=Male, High Speed Serial Data Connector=No, Housing Color=Green, Housing Material=PBT, Keyed=No, Lead Free="Lead Free", Length=5.08mm, Mating Alignment="No (Without)", Mating Connector Lock="No (Without)", Mount="Straddle Mount", Number of Contacts=2, Number of Positions=2, Number of Rows=1, Orientation=Straight, Packaging=Carton, PCB Mount Retention=Without, PCB Mounting Orientation=Vertical, Pitch=2.54mm, Plating Thickness=0.8um, Radiation Hardening=No, REACH SVHC="No SVHC", RoHS=Yes, Row Spacing=2.54mm, Selectively Loaded="No (Without)", Series="AMPMODU MOD II", Stabilizers="No (Without)", Strain Relief="No (Without)", Supplier 1=RSComponents, Termination="Through Hole"
P4 P5 P6 P7 P8: library part "TEST POINT", "Test Point ON"
Q1: "MOSFET N-CH 20V 4.2A SOT23", Case/Package=SOT-23, Continuous Drain Current (ID)=4.2A, Drain to Source Breakdown Voltage=20V, Drain to Source Resistance=45mR, Gate to Source Voltage (Vgs)=12V, Input Capacitance=740pF, Manufacturer="International Rectifier", Max Operating Temperature=150°C, Max Power Dissipation=1.25W, Min Operating Temperature=-55°C, Package Quantity=3000, Supplier Part Number 1=11X6741, Threshold Voltage=1.2V, Category=MOSFETs, ComponentLink1Description=https://datasheet.ciiva.com/36526/1563649-36526014.pdf?src-supplier=Jameco, ComponentLink1URL=https://datasheet.ciiva.com/36526/1563649-36526014.pdf?src-supplier=Jameco, ComponentLink2Description=https://datasheet.ciiva.com/16425/irlml2502pbf-16425943.pdf?src-supplier=Future+Electronics, ComponentLink2URL=https://datasheet.ciiva.com/16425/irlml2502pbf-16425943.pdf?src-supplier=Future+Electronics, ComponentLink3Description=https://datasheet.ciiva.com/6156/irlml2502-6156070.pdf?src-supplier=Farnell, ComponentLink3URL=https://datasheet.ciiva.com/6156/irlml2502-6156070.pdf?src-supplier=Farnell, ComponentLink4Description=https://datasheet.ciiva.com/7935/irlml2502-7935685.pdf?src-supplier=Element14, ComponentLink4URL=https://datasheet.ciiva.com/7935/irlml2502-7935685.pdf?src-supplier=Element14, Current Rating=4.2A, Drain to Source Voltage (Vdss)=20V, Drain-source On Resistance-Max=45mR, Dual Supply Voltage=20V, Element Configuration=Single, Fall Time=26ns, Height=1.02mm, Lead Free="Lead Free", Length=2.8mm, Manufacturer Part Number=IRLML2502TRPBF, Mount="Surface Mount", Nominal Vgs=1.2V, Number of Elements=1, Number of Pins=3, On-State Resistance=45mR, Packaging="Tape and Reel", Power Dissipation=1.25W, Radiation Hardening=No, Rds On Max=45mR, REACH SVHC="No SVHC", Rise Time=10ns, RoHS=Yes, Supplier 1=Newark, Termination=SMD/SMT, Turn-Off Delay Time=54ns, Turn-On Delay Time=7.5ns, Voltage Rating (DC)=20V, Width=1.4mm
R1 R18: library part AC0603JR-0710KL, "RES SMD 10K OHM 5% 1/10W 0603", Case Code (Imperial)=0603, Case Code (Metric)=1608, Manufacturer=Yageo, Max Operating Temperature=155°C, Max Power Dissipation=100mW, Min Operating Temperature=-55°C, Package Quantity=1, Resistance=10kR, Resistor Type="Thick Film", Supplier Part Number 1=1029044, Temperature Coefficient=100ppm/°C, Tolerance=5%, Voltage Rating=50V, Case/Package=0603, Category="Chip SMD Resistors", ComponentLink1Description=https://datasheet.ciiva.com/5562/pyu-ac-51-rohs-l-2-5562553.pdf?src-supplier=Mouser, ComponentLink1URL=https://datasheet.ciiva.com/5562/pyu-ac-51-rohs-l-2-5562553.pdf?src-supplier=Mouser, Construction=Rectangular, Depth=0.8mm, Features="Moisture Resistant,Automotive AEC-Q200,Anti-Sulfur", Height=0.022inch, Lead Free="Lead Free", Length=0.063inch, Manufacturer Part Number=AC0603JR-0710KL, Military Standard=Not, Number of Terminations=2, Packaging="Tape and Reel", Power Rating=100mW, Pricing 1="5000=0.00540 (USD)", RoHS=Yes, RoHS Compliant=Yes, Series=AC, Size Code=0603, Stock 1=1533000, Supplier 1="Future Electronics", Termination=SMD/SMT, Width=0.031inch
R19 R20: library part RTT25R18JTE, "RES SMD ±5% ±200ppm/℃ 0.18Ω 1W 2512", Manufacturer=RALEC, Package=2512, Power(Watts)=1W, Resistance=0.18Ω, Temperature Coefficient=±200ppm/℃, Tolerance=±5%
R21 R22 R29: library part RC0603FR-071KL, "RES SMD 1K OHM 1% 1/10W 0603", Case Code (Imperial)=0603, Case Code (Metric)=1608, Manufacturer=Yageo, Max Operating Temperature=155°C, Min Operating Temperature=-55°C, Power Rating=100mW, Resistance=1kR, Supplier Part Number 1=311-1.00KHRDKR-ND, Temperature Coefficient=100ppm/°C, Tolerance=1%, Voltage Rating=50V, Case/Package=0603, ComponentLink1Description=https://www.verical.com/server-webapp/html/getDatasheet?partID=409289&src-supplier=Verical, ComponentLink1URL=https://www.verical.com/server-webapp/html/getDatasheet?partID=409289&src-supplier=Verical, ComponentLink2Description=http://documents.rs-components.com/techlib://itc_doclist_GB.htm?stockno=5048928&src-supplier=RSComponents, ComponentLink2URL=http://documents.rs-components.com/techlib://itc_doclist_GB.htm?stockno=5048928&src-supplier=RSComponents, ComponentLink3Description=http://www.yageo.com/documents/recent/PYu-RC0603_51_RoHS_L_4.pdf?src-supplier=Avnet+Europe, ComponentLink3URL=http://www.yageo.com/documents/recent/PYu-RC0603_51_RoHS_L_4.pdf?src-supplier=Avnet+Europe, ComponentLink4Description=http://www.farnell.com/datasheets/2167052.pdf?src-supplier=Element14, ComponentLink4URL=http://www.farnell.com/datasheets/2167052.pdf?src-supplier=Element14, ComponentLink5Description=http://www.farnell.com/datasheets/1868787.pdf?src-supplier=Element14, ComponentLink5URL=http://www.farnell.com/datasheets/1868787.pdf?src-supplier=Element14, ComponentLink6Description=http://www.yageo.com/documents/recent/PYu-RC_Group_51_RoHS_L_2.pdf?src-supplier=Avnet, ComponentLink6URL=http://www.yageo.com/documents/recent/PYu-RC_Group_51_RoHS_L_2.pdf?src-supplier=Avnet, ComponentLink7Description=https://www.verical.com/server-webapp/html/getDatasheet?partID=404327&src-supplier=Verical, ComponentLink7URL=https://www.verical.com/server-webapp/html/getDatasheet?partID=404327&src-supplier=Verical, ComponentLink8Description=http://www.farnell.com/datasheets/443971.pdf?src-supplier=Element14, ComponentLink8URL=http://www.farnell.com/datasheets/443971.pdf?src-supplier=Element14, Composition="Thick Film", Contact Plating=Tin,Matte, Depth=0.8mm, Height=0.45mm, Lead Free="Lead Free", Length=1.6mm, Manufacturer Part Number=RC0603FR-071KL, Military Standard=Not, Packaging="Tape and Reel", Pricing 1="1=0.1, 10=0.023, 100=0.0094, 1000=0.0042, 2500=0.0037 (USD)", Radiation Hardening=No, REACH SVHC="No SVHC", Stock 1=21472395, Supplier 1=Digi-Key, Termination=SMD/SMT
R27: library part CSRN2512FK75L0, "RES 0.075 OHM 1% 2W 2512", Case Code (Imperial)=2512, Case Code (Metric)=6432, Manufacturer="Stackpole Electronics", Max Operating Temperature=155°C, Max Power Dissipation=2W, Min Operating Temperature=-55°C, Resistance=75mR, Resistor Type="Thick Film", Supplier Part Number 1=CSRN2512FK75L0CT-ND, Temperature Coefficient=200ppm/°C, Tolerance=1%, Case/Package=2512, Category="Chip SMD Resistors", ComponentLink1Description=https://www.seielect.com/catalog/SEI-Packaging.pdf?src-supplier=Digi-Key, ComponentLink1URL=https://www.seielect.com/catalog/SEI-Packaging.pdf?src-supplier=Digi-Key, ComponentLink2Description=https://www.seielect.com/Catalog/SEI-CSR_CSRN.pdf?src-supplier=Digi-Key, ComponentLink2URL=https://www.seielect.com/Catalog/SEI-CSR_CSRN.pdf?src-supplier=Digi-Key, Height=0.028inch, Lead Free="Lead Free", Length=0.25inch, Manufacturer Part Number=CSRN2512FK75L0, Mount="Surface Mount", Number of Terminations=2, Packaging="Tape and Reel", Pricing 1="1=0.58000, 10=0.42500, 25=0.34480, 50=0.30000, 100=0.24750, 250=0.21500, 500=0.17500 (USD)", RoHS=Yes, RoHS Compliant=Yes, Series=CSRN, Stock 1=153268, Supplier 1=Digi-Key, Width=0.124inch
R28: library part 0805W8F9001T5E, "RES SMD 9kΩ ±100ppm/℃ 0.125W 0805", Manufacturer=UNI-ROYAL, Package=0805, Power(Watts)=0.125W, Resistance=9K
R30 R31 R32 R34 R35 R36 R37 R38: library part RC0603FR-0749K9L, "Res Thick Film 1.6 x 0.8 mm 49.9K Ohm 1% 0.1W(1/10W) 100ppm/ C Molded SMD Paper T/R", Case Code (Imperial)=0603, Case Code (Metric)=1608, Manufacturer=Yageo, Max Operating Temperature=155°C, Max Power Dissipation=100mW, Min Operating Temperature=-55°C, Package Quantity=1, Resistance=49.9kR, Resistor Type="Thick Film", Supplier Part Number 1=311-49.9KHRCT-ND, Temperature Coefficient=100ppm/°C, Tolerance=1%, Voltage Rating=50V, Case/Package=0603, Category="Chip SMD Resistors", ComponentLink1Description=https://datasheet.ciiva.com/2454/pyu-r-int-thick-7-2454042.pdf?src-supplier=Digi-Key, ComponentLink1URL=https://datasheet.ciiva.com/2454/pyu-r-int-thick-7-2454042.pdf?src-supplier=Digi-Key, ComponentLink2Description=https://datasheet.ciiva.com/2454/pyu-r-int-thick-7-2454043.pdf?src-supplier=Digi-Key, ComponentLink2URL=https://datasheet.ciiva.com/2454/pyu-r-int-thick-7-2454043.pdf?src-supplier=Digi-Key, ComponentLink3Description=https://datasheet.ciiva.com/2454/pyu-r-int-thick-7-2454044.pdf?src-supplier=Digi-Key, ComponentLink3URL=https://datasheet.ciiva.com/2454/pyu-r-int-thick-7-2454044.pdf?src-supplier=Digi-Key, ComponentLink4Description=https://datasheet.ciiva.com/15189/getdatasheetpartid-323805-15189749.pdf?src-supplier=Verical, ComponentLink4URL=https://datasheet.ciiva.com/15189/getdatasheetpartid-323805-15189749.pdf?src-supplier=Verical, Construction=Rectangular, Depth=0.8mm, Features="Moisture Resistant", Height=0.022inch, Lead Free="Lead Free", Length=0.063inch, Manufacturer Part Number=RC0603FR-0749K9L, Military Standard=Not, Mount="Surface Mount", Number of Terminations=2, Packaging="Tape and Reel", Power Rating=100mW, Pricing 1="1=0.10000, 10=0.02400, 100=0.00970, 1000=0.00436, 2500=0.00378 (USD)", RoHS=Yes, RoHS Compliant=Yes, Series=RC, Size Code=0603, Stock 1=77863, Supplier 1=Digi-Key, Termination=SMD/SMT, Voltage Rating (DC)=50V, Width=0.031inch
R33 R39: library part RC0603JR-07330RL, "RES  SMD 330R 100 mW 0603", Case Code (Imperial)=0603, Case Code (Metric)=1608, Manufacturer=Yageo, Max Operating Temperature=155°C, Max Power Dissipation=100mW, Min Operating Temperature=-55°C, Package Quantity=5000, Resistance Tolerance=5%, Resistor Type="Thick Film", Supplier Part Number 1=311-330GRCT-ND, Temperature Coefficient=100ppm/°C, Voltage Rating=50V, Case/Package=0603, Category="Chip SMD Resistors", Construction=Rectangular, Depth=0.8mm, Features="Moisture Resistant", Height=0.45mm, Lead Free="Lead Free", Length=1.6mm, Manufacturer Part Number=RC0603JR-07330RL, Military Standard=Not, Number of Pins=2, Number of Terminations=2, Packaging="Tape and Reel", Power Rating=100mW, Pricing 1="1=0.10000, 10=0.02000, 100=0.00800, 1000=0.00360, 2500=0.00312 (USD)", REACH SVHC="No SVHC", Resistance=330R, RoHS=Yes, RoHS Compliant=Yes, Series=RC, Size Code=0603, Stock 1=1074593, Supplier 1=Digi-Key, Termination=SMD/SMT, Tolerance=5%, Voltage Rating (DC)=50V, Width=0.8mm
SB1 SB2 SB3 SB4 SB5: "Solder Bridge ON"
U1: "15V 1.3V @ 800mA Fixed 3.3V SOT-223 Linear Voltage Regulators (LDO) ROHS", Manufacturer="Diodes Incorporated", Package=SOT-223, Manufacturer Part No=AZ1117CH-3.3TRG1
U3: "Stepper Motor Driver/Controller, 5V to 36V, 1 to 256 Microsteps, 1.2A, QFN-32", Case/Package=QFN, Manufacturer=Trinamic, Max Operating Temperature=125°C, Min Operating Temperature=-40°C, Output Current=1.2A, Supplier Part Number 1=1460-1272-1-ND, ComponentLink1Description=https://www.trinamic.com/fileadmin/assets/Products/ICs_Documents/TMC220x_TMC222x_datasheet_Rev1.05.pdf?src-supplier=Digi-Key, ComponentLink1URL=https://www.trinamic.com/fileadmin/assets/Products/ICs_Documents/TMC220x_TMC222x_datasheet_Rev1.05.pdf?src-supplier=Digi-Key, Interface=UART, Logic Function="AND GATE", Manufacturer Part Number=TMC2202-WA-T, Mount="Surface Mount", Packaging="Cut Tape", Pricing 1="1=2.46000, 50=2.21000, 100=1.95000, 500=1.69000, 1000=1.63500 (USD)", Stock 1=10, Supplier 1=Digi-Key
U7: "2A 40V SOIC-8_EP_150mil DC-DC Converters ROHS", Manufacturer=XLSEMI, Package=SOIC-8, ComponentLink1Description=LCSC, ComponentLink1URL=https://www.lcsc.com/product-detail/DC-DC-Converters_XLSEMI-XL4001E1_C73347.html, Manufacturer Part No=XL4001E1

## Via types
v1: diameter 23.62, hole 11.81, Top Layer to Bottom Layer, tented both sides, 74 vias
v2: diameter 125.98, hole 125.98, Top Layer to Bottom Layer, 4 vias
v3: diameter 23.62, hole 11.81, Top Layer to Bottom Layer, 2 vias

## Nets (pads, with @x,y where several pads share a name; then routed paths per layer and width w, separated by ;. In a path a pad name is that pad's centre, name@x,y a point inside that pad or via, vN(x,y) a via of type N, cw(c..) or ccw(c..) an arc to the next point about the centre after c; other vN are vias at no path point)
5VOUT: C38.1 P4.1 U3.10 | length 880.5
  Top Layer w22: v1(1109,316) 1109,418 1160.75,469.75 1165,474 C38.1@1174,474 ; C38.1@1168,462.5 C38.1
  Top Layer w40: v1(1080,69) 1080,286.7 v1@1106,312.7 ; v1(1190,104) 1271,104 1289,86 1366.5,86 P4.1
  Bottom Layer w8: v1(1109,316) 1109,341.21 1163.57,395.79 U3.10
  Bottom Layer w40: v1(1080,69) 1151,69 v1@1187,105
#UART_RX: J1.25 J4.2 | length 643.2
  Top Layer w22: v1(-122,-52) -122,77
  Bottom Layer w22: v1(-122,-52) -83,-91 198,-91 269,-20 J1.25
#UART_TX: J1.23 J4.3 | length 407.2
  Top Layer w22: 2,204 2,208
  Bottom Layer w22: v1(63,230) 223,230 256,197 256,99 275,80 J1.23
DIAG: J1.20 SB1.2 | length 1306.2
  Top Layer w8: v1(438,318) 617,318 1021,722 1074,722 1096,700 SB1.2
  Bottom Layer w18: J1.20 231,280 269,318 v1(438,318)
DIR: J1.19 U3.20 | length 1235.1
  Top Layer w8: v1(426,280) 600.95,280 1016.27,695.32 v1(1050.68,695.32)
  Bottom Layer w8: v1@1050.68,690.32 1055.35,695 1239,695 1271.16,662.84 U3.20
  Bottom Layer w22: J1.19 v1(426,280)
FB: R28.2 R29.2 U7.4 | length 162.4
  Top Layer w22: -181,584 U7.4 U7.4@-48.81,583.19 ; R28.2@-160,619 R28.2@-158,621 ; R28.2@-160,626.5 -160,623 R28.2@-158,621 ; R28.2@-157,622 R28.2@-158,621 ; R28.2@-144.5,611 -148,611 R28.2@-158,621
GND: C1.2 C2.1 C34.2 C35.2 C38.2 C40.2 C43.2 C44.2 C45.2 C48.2 C49.2 C50.2 C51.2 C52.2 C53.2 C54.2 C55.2 C56.2 C57.2 C58.2 C79.2 D2.1 J1.24 J1.26 J4.4 P3.2 P8.1 Q1.2 R1.2 R18.2 R19.1 R20.1 R27.1 R29.1 R33.2 R39.2 U1.1 U3.6 U3.14 U3.19 U3.33 U7.3 U7.6 U7.9 | length 6640
  Top Layer w22: 58,1031 511,1031 ; 232,649 232.5,649 ; 235.5,638.5 235.5,654.5 ; 235.5,661 242,654.5 243.74,654.5 ; v1(512,1079) 512,1033.89 528.22,1017.66 533,1012.89 R33.2 ; v1(668,434) 669,434 v1(758,523) ; 1197,595 1197,877 v1(1245,925)
  Top Layer w40: J4.4 v1(-47,242) ; C1.2 C1.2@231,27.13 ; R1.2@297,387.5 v1(297,27) 297,-80 P3.2@363,-146 ; C43.2@300.68,1315 C43.2 ; v1(543.71,-52.71) 543.71,136.01 v1(764.7,357) ; v1(563,1188) 606.79,1144.21 606.79,1080.32 v1@607.41,1079.7 ; v1(607.24,1079.53) 793,893.77 793,838 845,786 1024.61,786 1048.04,809.43 1048.04,1233.96 1004,1278 v1@859,1278 ; v1@776,230.11 v1(776,70) 776.9,69.1 813.9,69.1 883,0 976,0 ; v1(1245,925) 1246.89,926.89 1246.89,1038.04 C79.2 ; v1(1252,156) 1276,180 P8.1
  Bottom Layer w8: U3.14 1251.47,474.53 U3.19 1251.47,599.53 v1(1238,613) ; v1(1252,156) 1252,349.98 U3.6 1251.47,415.47 U3.33
  Bottom Layer w22: v1(512,1079) 606.72,1079 v1(607.24,1079.53) ; C49.2@816,1269 C49.2@817,1268
  Bottom Layer w40: -168,484 -71.43,484 -48,507.43 v1(-48,632) ; C2.1 C2.1@38,1074 ; U1.1 U1.1@30,735.68 ; v1@40,1010 ccw(c42,1010) v1(42,1008) v1@43,1008 ; P3.2@363,-146 456.29,-52.71 v1(543.71,-52.71) ; R39.2 403,1353 517.13,1353 543,1327.13 543,1208 v1(563,1188) ; v1(668,434) C50.2 ; C58.2@963,21.81 974,21.81 1198.66,21.81 v2(1220.47,0) 1252,31.53 v1(1252,156) 1122.54,156 1108.05,170.5 R20.1@1108.05,173
  other v1: 974,17 198,58 198,90 775.19,230.92 1297,459 -182,482 798,828.19 724,967 858,1277 237,1321
  other v2: 0,0 0,1220.47 1220.47,1220.47
GND_ETH: C58.1 J2.4 J2.5 J2.MH1 J2.MH2 J3.4 J3.5 J3.MH1 J3.MH2 | length 2648
  Top Layer w22: v1(618,614) ccw(c619.04,614) 619.04,612.96 J2.MH2 J2.MH2@771.04,600.05
  Top Layer w40: J3.MH1@767.56,727.44 769.3,725.7 769.3,614.71 J2.MH2 ; J2.MH1 771.04,8.49 729,50.53 729,254.83 752.09,277.92 J2.5
  Bottom Layer w22: v1(618,614) ccw(c618,548) 552,548 552,448 725,275 725,216.44 726,215.44 v1(726,215)
  Bottom Layer w40: J3.MH1 947.96,724.96 1060,837 1060,1060 ; J3.MH2 1040.96,1345.04 1060,1326 1060,1060 ; J3.5@884.53,1012.94 J3.4@977.4,1059.38 ; J2.5 J2.4 ; J3.4 1060,1060
LINK0: J1.15 J2.L3 | length 144.4
  Bottom Layer w22: J1.15 435.11,480 460.67,454.44 466.19,460.92 J2.L3
LINK1: J1.18 J3.L3 | length 1689.8
  Top Layer w8: v1(445,349.19) 626.45,349.19 831.25,553.99 831.25,755.75 566,1021 566,1093.19 ; J3.L3 J3.L3@481.1,1178.09 ; J3.L3@481.1,1178.09 566,1093.19 ; J3.L3@481.1,1178.09 566,1093.19
  Bottom Layer w15: J1.18 241,380 271.58,349.42 444.77,349.42 v1(445,349.19)
MOTOR_A1: P1.1 U3.27 | length 1384.1
  Top Layer w8: P1.1 706,-194 1255,-194 1409,-40 1409,473.81 v1(1407.81,475)
  Bottom Layer w8: U3.27 1375.72,474.76 1407.57,474.76 v1(1407.81,475)
MOTOR_A2: P1.2 U3.24 | length 1220.8
  Top Layer w8: P1.2@757,-148 821,-84 1100,-84 1145,-39 1145,110 1363,328 1363,595 v1@1362,596
  Bottom Layer w8: U3.24 1349.9,582.9 v1(1363,596)
MOTOR_B1: P1.3 U3.30 | length 1128.2
  Bottom Layer w8: P1.3 906,-194 1255,-194 1416,-33 1416,404 1404.53,415.47 U3.30
MOTOR_B2: P1.4 U3.1 | length 836
  Bottom Layer w8: P1.4@957,-148 1013,-92 1311.31,-92 1316,-87.31 1316,264.44 1349.9,298.34 U3.1
MS1: SB2.1 U3.11 | length 100.5
  Bottom Layer w8: SB2.1@1086,415.47 U3.11
MS2: SB3.1 U3.12 | length 158.6
  Bottom Layer w8: SB3.1 1063,439.84 1068.84,434 1185.35,434 U3.12
NetC36_1: C36.1 U3.7 | length 97.3
  Top Layer w8: v1(1228,312) C36.1
  Bottom Layer w8: v1@1221,312 1221,312.84 v1@1224.08,315.92 ; v1(1228,312) 1231.79,315.79 U3.7
NetC36_2: C36.2 U3.8 | length 5.7
  Bottom Layer w8: v1@1178,346 v1(1182,350)
NetC37_1: C37.1 U3.9 | length 204.9
  Top Layer w8: v1(1147.58,316.42) 1140,324 1140,405 1148.19,413.19 C37.1@1161.46,413.19
  Bottom Layer w8: v1(1147.58,316.42) 1147.58,358.58 1165.1,376.1 U3.9
NetD2_2: D2.2 L10.1 U7.1 U7.2 | length 331.4
  Bottom Layer w22: v1@-14,800.56 -14,658 11.61,632.39 D2.2 11.61,497.61 v1(-1,485)
  other v1: -13.38,801.19
NetJ2_L4: J2.L4 R33.1 | length 119.7
  Top Layer w22: 474,670 474.09,669.91 474.09,551.05 J2.L4
  Bottom Layer w22: J2.L4@472.48,544.85 J2.L4@472.89,545.26
NetJ3_L4: J3.L4 R39.1 | length 77.6
  Bottom Layer w22: R39.1 396.48,1285.52 J3.L4@470.7,1285.52 ; J3.L4@469.08,1279.93 J3.L4@470.48,1281.33 ; J3.L4@471,1286.06 J3.L4@471.48,1285.58
NetR18_1: R18.1 SB4.1
NetR19_2: R19.2 U3.25 | length 359.7
  Bottom Layer w8: U3.25 1397.9,513.9 1406,522 1406,552
  Bottom Layer w22: R19.2 1387,745 1406,726 1406,552
NetR20_2: R20.2 U3.32 | length 228
  Bottom Layer w8: R20.2@1363.95,182 1365,183.05 1365,273 1398,306 1398,371.42 1393.31,376.1 U3.32
NetR21_2: R21.2 SB2.2 | length 365.8
  Bottom Layer w8: SB2.2 1038.84,352 1033,357.84 1033,617 1060,644 R21.2
NetR22_2: R22.2 SB3.2
NetSB1_1: SB1.1 U3.13 | length 173.2
  Top Layer w8: v1(1113.91,465.07) 1138,489.16 1138,550 1139,551
  Bottom Layer w8: v1(1113.91,465.07) 1118.14,465.07 1128.37,454.84 U3.13
NetSB4_2: SB4.2 U3.5 | length 70
  Bottom Layer w8: SB4.2@1268,281 SB4.2@1269.16,282.16 ; SB4.2@1271.16,282.16 U3.5
NetSB5_2: SB5.2 U3.15 | length 1539.7
  Top Layer w8: v1(675,-30.19) 675,-37.69 701.97,-64.66 704.31,-67 764.77,-67 ccw(c771.04,-7.12) 777.31,-67 1015,-67 1049,-33 1049,445.82 v1(1099.18,496)
  Bottom Layer w8: SB5.2@488,318 520,318 543.71,294.29 543.71,16.29 590.19,-30.19 v1(675,-30.19) ; v1(1099.18,496) 1100,496 1101.79,494.21 U3.15
OPTO_IN: J1.5 Q1.1 R1.1 | length 508.7
  Bottom Layer w8: v1@264,564 244,584 244,937.58 cw(c286.42,937.58) 286.42,980 J1.5
  other v1: 268.84,564.21
RCS: D3.1 P2.2 Q1.3 R27.2 U7.5 | length 965.8
  Top Layer w8: D3.1@233.77,447.62 256.31,447.62 265,438.94 265,-70.56 248,-87.56 P2.2@248,-146
  Bottom Layer w22: R27.2 4,414 31,441 v1(233.77,441)
RXA_N: C54.1 J1.13 J2.7 R37.1 | length 998.6
  Top Layer w10: v1(556.31,392) 556.31,395.69 551,401 551,637.69 558.62,645.31 v1(558.62,649)
  Bottom Layer w10: J1.13 346.66,582.66 cw(c388,582.66) 388,624 533.62,624 ccw(c533.62,649) v1(558.62,649) ; v1(556.31,392) 556.31,373.69 ccw(c602,373.69) 602,328 cw(c602,252) 678,252 678,196 ccw(c696.08,196) 696.08,177.92 J2.7
RXA_P: C52.1 J1.11 J2.8 R35.1 | length 1105.3
  Top Layer w10: v1(525.69,392) 525.69,395.69 531,401 531,649 v1(528,649)
  Bottom Layer w10: J1.11 ccw(c382.66,680) 382.66,644 523,644 ccw(c523,649) v1(528,649) ; v1(525.69,392) 525.69,384.31 ccw(c602,384.31) 602,308 cw(c602,252) 658,252 658,196 ccw(c726.08,196) 726.08,127.92 J2.8
RXB_N: C55.1 J1.16 J3.7 R38.1 | length 1347.5
  Top Layer w10: v1(407.86,514.58) 404.53,514.58 376,543.11 376,956 406.88,986.88 483,986.88 488.31,992.19 v1(492,992.19)
  Bottom Layer w10: J1.16 138,510 cw(c148,510) 140.93,517.07 cw(c148,510) 148,520 392.25,520 cw(c392.25,510.93) 398.66,517.34 398.71,517.3 ccw(c405,523.59) v1@405,514.69 ; v1@405.05,514.69 cw(c404.98,504.69) 405.43,514.68 v1(407.86,514.58) ; v1(492,992.19) 642.81,992.19 cw(c642.81,955) 680,955 680,927 ccw(c697,927) 697,910 C55.1 814,910 J3.7
RXB_P: C53.1 J1.14 J3.8 R36.1 | length 1376.2
  Top Layer w10: v1(407.59,545.2) 407.59,546.28 396,557.87 396,947.72 415.16,966.88 483,966.88 488.31,961.57 v1(492,961.57)
  Bottom Layer w10: J1.14 138,550 ccw(c148,550) 140.93,542.93 ccw(c148,550) 148,540 392.25,540 ccw(c392.25,549.07) 398.66,542.66 398.71,542.7 cw(c405,536.41) 405,545.31 405.4,545.31 cw(c405.44,535.31) 406.08,545.29 v1(407.59,545.2) ; v1(492,961.57) 653.43,961.57 cw(c653.43,955) 660,955 660,927 ccw(c727,927) 727,860 C53.1@783,860 ; C53.1@785,860 R36.1@830,860 ; R36.1@836,860 J3.8
STEP: J1.21 U3.17 | length 1204.5
  Top Layer w8: v1(508,245) 587.16,245 965.16,623 v1(1010,623)
  Bottom Layer w8: J1.21 417,180 482,245 v1(508,245) ; v1(1010,623) 1010.61,623 1067.61,680 1197.56,680 1212.1,665.45 U3.17
TXA_N: C50.1 J1.9 J2.2 R32.1 | length 1116.4
  Bottom Layer w8: 646,672 657.41,660.59 657.41,611.15 711,557.57 711,452.04 727.04,436 748.5,436 762.5,422 C50.1 767.5,422 782.91,437.41 847.64,437.41 857.13,427.92 J2.2
  Bottom Layer w10: J1.9 ccw(c306.66,780) 306.66,820 290,820 ccw(c290,810) 280,810 280,751 ccw(c297,751) 297,734 611.67,734 629,716.67 629,689 646,672
TXA_P: C48.1 J1.7 J2.1 R30.1 | length 1075.7
  Top Layer w8: v1(602.16,707) v1(655,707) v1@652.16,709.84
  Bottom Layer w8: v1(655,707) 678,684 678,616.02 729,565.02 729,459.5 734.5,454 744.81,454 749.5,458.69 749.5,459 760.5,470 C48.1 765.5,470 780.09,455.41 850.27,455.41 872.78,477.92 J2.1
  Bottom Layer w10: J1.7 cw(c306.66,880) 306.66,840 270,840 ccw(c270,830) 260,830 260,751 ccw(c297,751) 297,714 594.31,714 598.48,709.84 v1@602.16,709.84
TXB_N: C51.1 J1.12 J3.2 R34.1 | length 1218.6